# Altium PCB MiniPC.PcbDoc (part 9 of 24)
Units mm, origin at the board's own origin, x right, y up, seen from the top; angles counter-clockwise.
Board outline 175 x 155 mm, 16 copper layers (1_Top, 2_int1_(gnd), 3_int2_(power), 4_int3_(gnd), 5_int4_(sign), 6_int5_(power), 7_int6_(sign), 8_int7_(power), 9_int8_(gnd), 10_int9_(sign), 11_int10_(gnd), 12_int11_(sign), 13_int12_(gnd), 14_int13_(power), 15_int14_(gnd), 16_Bottom), stack 2.008 mm thick; 1046 components, 837 nets, 6010 pads, 4009 vias.
Unrouted connection lines stored in the file: 564.
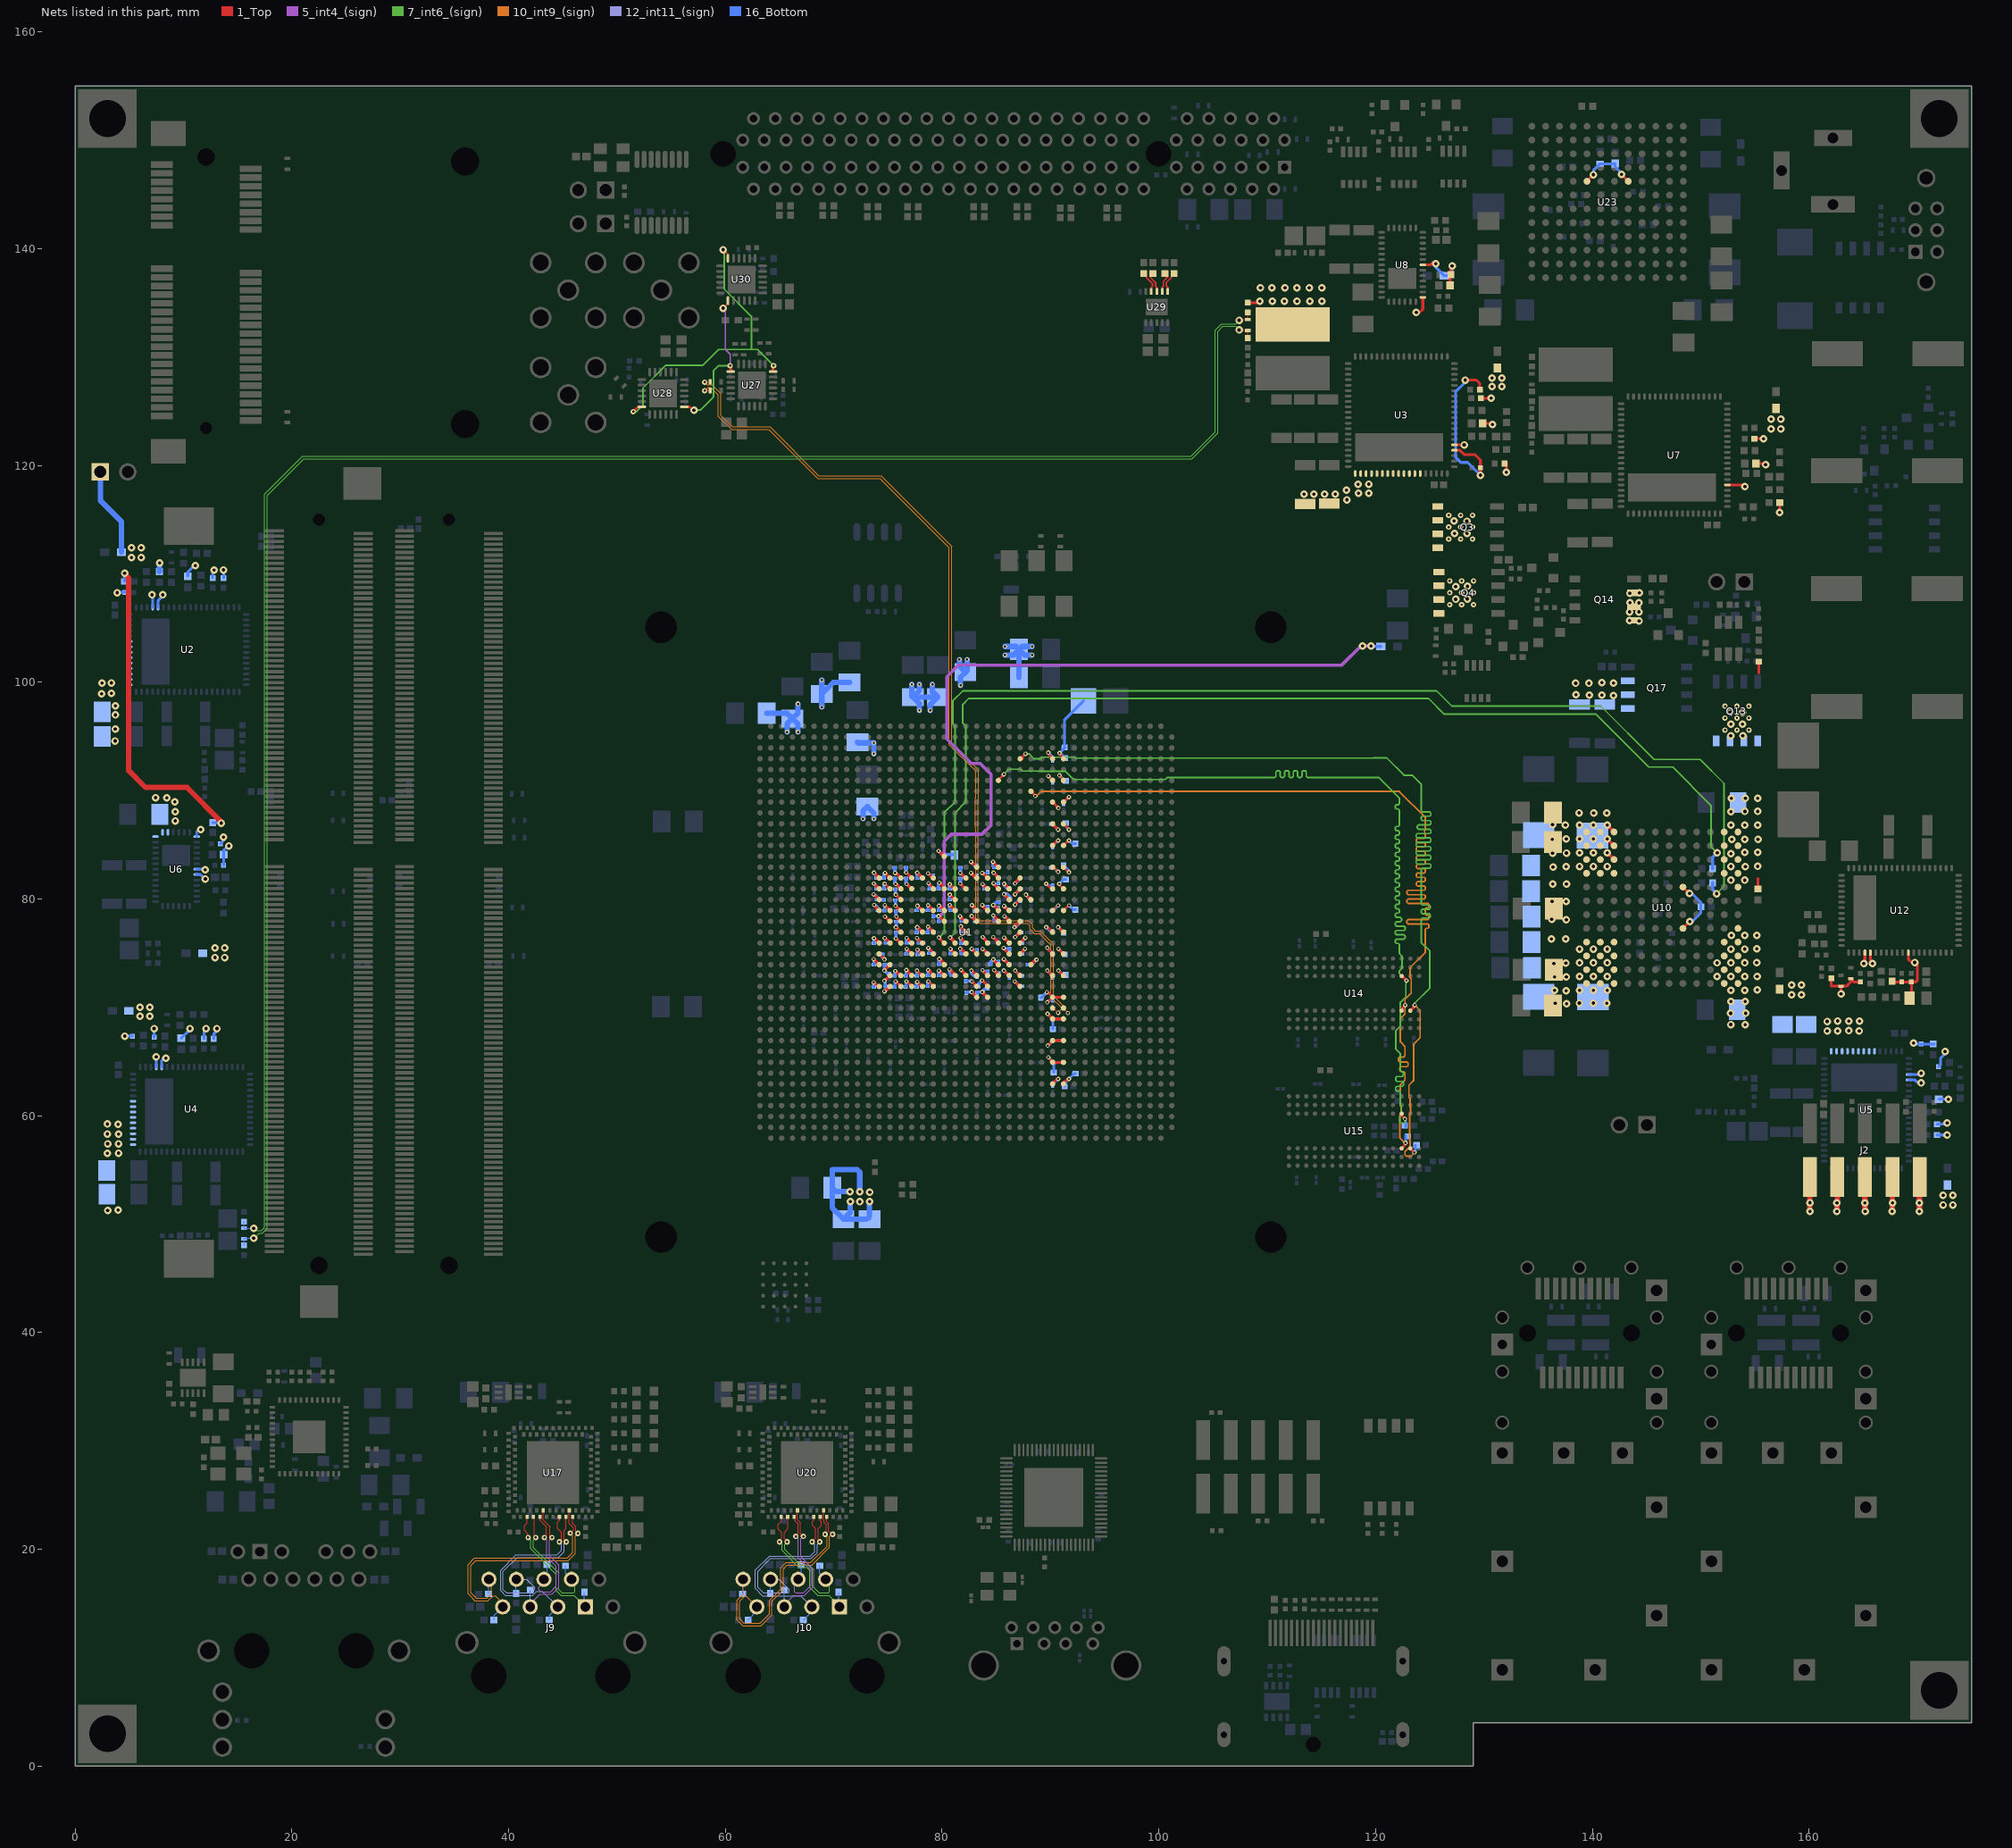
[diagram p21: the nets of this part, all layers, seen from the top]

## Via types
v1: diameter 0.4, hole 0.2, 1_Top to 16_Bottom, tented both sides, 1658 vias
v2: diameter 0.5, hole 0.2, 1_Top to 16_Bottom, tented both sides, 1014 vias
v3: diameter 0.7, hole 0.3, 1_Top to 16_Bottom, tented both sides, 915 vias
v4: diameter 0.6, hole 0.2, 1_Top to 16_Bottom, tented both sides, 278 vias
v5: diameter 0.4, hole 0.2, 1_Top to 16_Bottom, 93 vias
v6: diameter 0.4/0/0/0/0/0/0/0/0/0/0/0/0/0/0/0.4 (per signal layer), hole 0.2, 1_Top to 16_Bottom, tented both sides, 18 vias
v7: diameter 0.4/0/0/0/0/0/0/0/0/0/0/0.4/0.4/0.4/0.4/0.4 (per signal layer), hole 0.2, 1_Top to 16_Bottom, tented both sides, 16 vias
v8: diameter 0.5, hole 0.254, 1_Top to 16_Bottom, tented both sides, 15 vias
v9: diameter 0.5, hole 0.2, 1_Top to 16_Bottom, 2 vias

## Nets (pads, with @x,y where several pads share a name; then routed paths per layer and width w, separated by ;. In a path a pad name is that pad's centre, name@x,y a point inside that pad or via, vN(x,y) a via of type N, cw(c..) or ccw(c..) an arc to the next point about the centre after c; other vN are vias at no path point) (continued)
A10_0V9: C80.1 C81.1 C82.2 C83.2 C84.2 C87.1 C88.1 C89.2 C90.2 C91.2 C92.2 C93.2 C132.2 C133.2 C134.2 C135.2 C136.2 C137.2 C138.2 C139.2 C140.2 C141.2 C147.2 C148.2 C149.2 C150.2 C151.2 C152.2 C153.2 C154.2 C155.2 C156.2 C157.2 C158.2 C159.2 C160.2 C168.2 C169.2 C170.2 C171.2 C172.2 C173.2 C174.2 C175.2 C176.2 C177.2 C178.2 C179.2 C180.2 C181.2 C182.2 C183.2 C184.2 C185.2 C186.2 C187.2 C188.2 C189.2 C190.2 C191.2 C192.2 C193.2 C194.2 C195.2 C196.2 C197.2 C198.2 C199.2 C200.2 C201.2 C202.2 C203.2 C204.2 C205.2 C206.2 C207.2 C208.2 C209.2 C210.2 C211.2 C212.2 C213.2 C214.2 C215.2 C216.2 C217.2 C218.2 C219.2 C220.2 C221.2 C222.2 C223.2 C224.2 C225.2 C226.2 C227.2 C228.2 C229.2 C230.2 C231.2 C232.2 C233.2 C234.2 C235.2 C236.2 C237.2 C238.2 C239.2 C240.2 C241.2 C242.2 C243.2 C244.2 C245.2 C246.2 C247.2 C248.2 C249.2 C250.2 C251.2 C252.2 C253.2 C254.2 C255.2 C256.2 C257.2 C258.2 C259.2 C260.2 C261.2 C262.2 C263.2 U1.AA12 U1.AA13 U1.AA14 U1.AA15 U1.AA16 U1.AA20 U1.AA22 U1.AA23 U1.AA24 U1.AA25 U1.AB12 U1.AB15 U1.AB16 U1.AB17 U1.AB19 U1.AB20 U1.AB21 U1.AB22 U1.AB24 U1.AB25 U1.AC12 U1.AC13 U1.AC18 U1.AC23 U1.AC24 U1.AC26 U1.AD13 U1.AD14 U1.AD15 U1.AD16 U1.AD17 U1.AD18 U1.AD19 U1.AD20 U1.AD21 U1.AD22 U1.AD23 U1.AD24 U1.AD25 U1.AE12 U1.AE13 U1.AE14 U1.AE15 U1.AE16 U1.AE17 U1.AE21 U1.AE22 U1.AE25 U1.AF21 U1.AF22 U1.P21 U1.P23 U1.R12 U1.R13 U1.R14 U1.R15 U1.R16 U1.R17 U1.R20 U1.R21 U1.R22 U1.R23 U1.R25 U1.T12 U1.T13 U1.T14 U1.T15 U1.T17 U1.T18 U1.T19 U1.T20 U1.T22 U1.T23 U1.T24 U1.T25 U1.U12 U1.U14 U1.U19 U1.U24 U1.U25 U1.U26 U1.V12 U1.V13 U1.V14 U1.V16 U1.V17 U1.V18 U1.V19 U1.V21 U1.V22 U1.V23 U1.V24 U1.W13 U1.W14 U1.W20 U1.W21 U1.W23 U1.W24 U1.W25 U1.Y14 U1.Y16 U1.Y17 U1.Y20 U1.Y25 U10.A1 U10.A2 U10.A3 U10.B1 U10.B2 U10.B3 U10.C1 U10.C2 U10.C3 U10.D1 U10.D2 U10.D3 U10.J1 U10.J2 U10.J3 U10.K1 U10.K2 U10.K3 U10.L1 U10.L2 U10.L3 U10.M1 U10.M2 U10.M3 | length 191.1
  1_Top w0.25: U1.AB12@74.194,74.939 74.679,74.455 v1(74.679,74.429) ; v1(74.7,81.4) 74.733,81.4 U1.T13@75.194,80.939
  1_Top w0.3: v1(73.675,80.425) 73.708,80.425 U1.U12@74.194,79.939 ; v1(73.679,72.304) 73.721,72.304 74.086,71.939 U1.AE12@74.194,71.939 ; v1@73.68,74.454 U1.AC12@74.194,73.939 ; v1(73.7,81.425) 74.186,80.939 U1.T12@74.194,80.939 ; v1(73.704,76.379) 73.771,76.379 74.194,75.956 U1.AA12@74.194,75.939 ; v1(73.708,82.425) U1.R12@74.194,81.939 ; v1(73.725,79.45) 73.725,79.408 U1.V12@74.194,78.939 ; v1(74.679,71.478) 74.733,71.478 U1.AE13@75.194,71.939 ; v1(74.679,72.454) 74.708,72.454 U1.AD13@75.194,72.939 ; v1(74.7,76.4) 74.733,76.4 U1.AA13@75.194,75.939 ; v1(74.704,79.429) U1.V13@75.194,78.939 ; v1@74.721,73.404 v1(74.679,73.404) 74.679,73.424 U1.AC13@75.194,73.939 ; v1(74.725,78.375) 74.758,78.375 U1.W13@75.194,77.939 ; v1(74.729,82.404) U1.R13@75.194,81.939 ; v1(75.665,82.4) 75.733,82.4 U1.R14@76.194,81.939 ; v1(75.679,73.354) 75.721,73.354 76.136,72.939 U1.AD14@76.194,72.939 ; v1(75.7,79.375) 76.136,78.939 U1.V14@76.194,78.939 ; v1(75.704,72.404) 75.73,72.404 U1.AE14@76.194,71.939 ; v1(75.704,81.379) 75.754,81.379 U1.T14@76.194,80.939 ; v1(75.725,76.35) 75.75,76.35 76.161,75.939 U1.AA14@76.194,75.939 ; v1(75.725,77.4) 75.733,77.4 U1.Y14@76.194,76.939 ; v1(75.725,80.4) 75.733,80.4 U1.U14@76.194,79.939 ; v1(75.775,78.375) 75.775,78.358 U1.W14@76.194,77.939 ; v1(76.675,82.45) 76.683,82.45 U1.R15@77.194,81.939 ; v1(76.7,73.45) 76.7,73.433 U1.AD15@77.194,72.939 ; v1(76.704,72.404) 76.73,72.404 U1.AE15@77.194,71.939 ; v1(76.725,75.4) 77.186,74.939 U1.AB15@77.194,74.939 ; v1(76.725,76.4) 77.186,75.939 U1.AA15@77.194,75.939 ; v1(76.729,81.379) 76.746,81.379 77.186,80.939 U1.T15@77.194,80.939 ; v1(77.675,73.4) 78.136,72.939 U1.AD16@78.194,72.939 ; v1(77.675,76.4) 78.136,75.939 U1.AA16@78.194,75.939 ; v1(77.7,72.35) 78.111,71.939 U1.AE16@78.194,71.939 ; v1(77.7,77.4) 77.733,77.4 U1.Y16@78.194,76.939 ; v1(77.7,82.425) 78.186,81.939 U1.R16@78.194,81.939 ; v1(77.725,75.325) 78.111,74.939 U1.AB16@78.194,74.939 ; v1(77.725,79.375) 78.161,78.939 U1.V16@78.194,78.939 ; v1(78.7,77.45) 79.194,76.956 U1.Y17@79.194,76.939 ; v1(78.7,79.425) 78.708,79.425 U1.V17@79.194,78.939 ; v1(78.7,82.375) 79.136,81.939 U1.R17@79.194,81.939 ; v1(78.704,73.454) 78.721,73.454 79.194,72.981 U1.AD17@79.194,72.939 ; v1(78.725,75.475) 78.75,75.475 79.194,75.031 U1.AB17@79.194,74.939 ; v1(78.729,72.404) 78.746,72.404 79.194,71.956 U1.AE17@79.194,71.939 ; v1(78.75,81.45) 79.194,81.006 U1.T17@79.194,80.939 ; v1(79.704,73.379) 79.721,73.379 80.161,72.939 U1.AD18@80.194,72.939 ; v1(79.704,79.379) 79.746,79.379 80.186,78.939 U1.V18@80.194,78.939 ; v1(79.75,74.475) 80.194,74.031 U1.AC18@80.194,73.939 ; v1(79.75,81.5) 80.194,81.056 U1.T18@80.194,80.939 ; v1(80.679,73.504) 80.696,73.504 81.194,73.006 U1.AD19@81.194,72.939 ; v1(80.7,79.45) 80.7,79.433 U1.V19@81.194,78.939 ; v1(80.7,80.4) 81.161,79.939 U1.U19@81.194,79.939 ; v1(80.7,81.35) 81.111,80.939 U1.T19@81.194,80.939 ; v1(80.775,75.4) 80.775,75.358 U1.AB19@81.194,74.939 ; v1(81.65,78.4) 82.111,77.939 U1.W20@82.194,77.939 ; v1(81.675,75.425) 81.708,75.425 U1.AB20@82.194,74.939 ; v1(81.675,81.425) 82.161,80.939 U1.T20@82.194,80.939 ; v1(81.675,82.4) 82.136,81.939 U1.R20@82.194,81.939 ; v1(81.7,76.4) 82.161,75.939 U1.AA20@82.194,75.939 ; v1(81.725,77.475) 81.725,77.408 U1.Y20@82.194,76.939 ; v1(81.75,73.45) 82.194,73.006 U1.AD20@82.194,72.939 ; v1(82.675,82.4) 82.675,82.375 83.111,81.939 U1.R21@83.194,81.939 ; v1(82.675,83.425) 82.708,83.425 U1.P21@83.194,82.939 ; v1(82.7,73.4) 82.733,73.4 U1.AD21@83.194,72.939 ; v1(82.725,71.425) 82.725,71.408 U1.AF21@83.194,70.939 ; v1(82.725,72.4) 82.733,72.4 U1.AE21@83.194,71.939 ; v1(82.725,75.4) 82.733,75.4 U1.AB21@83.194,74.939 ; v1(82.725,78.425) 82.725,78.375 83.161,77.939 U1.W21@83.194,77.939 ; v1(82.75,79.425) 82.75,79.383 U1.V21@83.194,78.939 ; v1(83.679,72.479) 83.721,72.479 84.194,72.006 U1.AE22@84.194,71.939 ; v1(83.7,71.425) 83.708,71.425 U1.AF22@84.194,70.939 ; v1(83.7,82.4) 83.733,82.4 U1.R22@84.194,81.939 ; v1(83.704,79.429) 83.704,79.396 84.161,78.939 U1.V22@84.194,78.939 ; v1(83.725,73.425) 84.194,72.956 U1.AD22@84.194,72.939 ; v1(83.725,75.4) 84.186,74.939 U1.AB22@84.194,74.939 ; v1(83.725,81.375) 84.161,80.939 U1.T22@84.194,80.939 ; v1(83.75,76.475) 84.194,76.031 U1.AA22@84.194,75.939 ; v1(84.7,83.425) 84.7,83.375 85.136,82.939 U1.P23@85.194,82.939 ; v1(84.704,79.429) 84.771,79.429 85.194,79.006 U1.V23@85.194,78.939 ; v1(84.725,76.475) 85.194,76.006 U1.AA23@85.194,75.939 ; v1(84.725,78.475) 85.194,78.006 U1.W23@85.194,77.939 ; v1(84.729,74.429) 84.729,74.404 U1.AC23@85.194,73.939 ; v1(84.75,81.45) 84.75,81.383 U1.T23@85.194,80.939 ; v1(84.75,82.425) 85.194,81.981 U1.R23@85.194,81.939 ; v1(84.8,73.425) 85.194,73.031 U1.AD23@85.194,72.939 ; v1(85.675,75.475) 85.675,75.458 U1.AB24@86.194,74.939 ; v1(85.7,73.4) 86.161,72.939 U1.AD24@86.194,72.939 ; v1(85.7,74.45) 85.7,74.433 U1.AC24@86.194,73.939 ; v1(85.725,76.425) 86.194,75.956 U1.AA24@86.194,75.939 ; v1(85.725,79.35) 85.725,79.3 86.086,78.939 U1.V24@86.194,78.939 ; v1(85.725,80.45) 85.725,80.408 U1.U24@86.194,79.939 ; v1(85.725,81.4) 85.733,81.4 U1.T24@86.194,80.939 ; v1(85.754,78.404) 85.771,78.404 86.194,77.981 U1.W24@86.194,77.939 ; v1(86.675,77.4) 86.675,77.42 U1.W25@87.194,77.939 ; v1(86.7,72.4) 87.161,71.939 U1.AE25@87.194,71.939 ; v1(86.725,76.475) 86.73,76.475 U1.Y25@87.194,76.939 ; v1(86.725,79.475) 86.73,79.475 U1.U25@87.194,79.939 ; v1(86.725,80.425) 87.194,80.894 U1.T25@87.194,80.939 ; v1(86.725,81.425) 86.725,81.47 U1.R25@87.194,81.939 ; v1(86.733,73.4) U1.AD25@87.194,72.939 ; U1.AB25@87.194,74.939 87.65,75.395 v1(87.65,75.4) ; U1.AA25@87.194,75.939 87.194,75.944 v1(87.675,76.425) ; v1(87.733,80.4) U1.U26@88.194,79.939 ; U1.AC26@88.194,73.939 88.655,74.4 v1(88.7,74.4) ; v3(141.36,84.275) U10.C3@141.995,83.64 ; v3(141.36,85.545) U10.B3@141.995,84.91 ; v3(141.36,86.815) U10.A3@141.995,86.18 ; U10.D3@141.815,82.37 U10.D3@141.995,82.37
  16_Bottom w0.17: v1(82.675,82.4) 82.915,82.16 C184.2@83.2,82.16 ; v1(83.7,82.4) 84.14,82.4 C175.2@84.2,82.46 ; v1(84.75,81.45) 85.19,81.45 C202.2@85.2,81.46
  16_Bottom w0.3: C137.2@73,50.475 C137.2@73.3,50.475 C137.2@73.3,50.75 ; v1(73.675,80.425) 73.745,80.425 73.985,80.185 C244.2@73.985,79.95 74.01,79.925 C245.2@74.615,79.925 ; v1(73.679,72.304) 73.685,72.297 C198.2@73.685,71.875 ; v1(73.679,74.454) 73.71,74.422 C153.2@73.71,73.95 ; v1(73.7,81.425) 73.935,81.19 C231.2@73.935,80.95 ; v1(73.704,76.379) 73.71,76.372 C240.2@73.71,75.925 ; v1@73.708,82.492 v1(73.708,82.425) 73.708,82.356 73.96,82.104 C220.2@73.96,81.925 ; v1(73.725,79.45) 73.845,79.45 74.06,79.235 C234.2@74.06,78.975 ; C258.2@74.485,74.908 74.485,74.622 v1(74.679,74.429) ; C221.2@74.615,81.925 74.615,82.29 v1(74.729,82.404) ; C241.2@74.64,80.925 74.64,81.34 v1(74.7,81.4) ; C218.2@74.665,78.925 74.704,78.964 v1(74.704,79.429) ; v1(74.679,72.454) 74.75,72.382 74.75,71.96 C238.2@74.785,71.925 ; v1(74.7,76.4) 74.785,76.315 C219.2@74.785,75.95 ; C237.2@74.735,73.95 74.679,73.894 v1(74.679,73.404) 74.997,73.085 C197.2@75.15,73.085 ; C199.2@75.59,71.875 75.67,71.955 75.67,72.37 v1(75.704,72.404) ; C211.2@75.615,72.9 75.679,72.964 v1(75.679,73.354) ; C243.2@75.64,81.9 75.64,81.443 v1(75.704,81.379) ; C235.2@75.64,82.9 75.64,82.425 v1(75.665,82.4) ; C246.2@75.69,79.9 75.69,79.385 v1(75.7,79.375) ; C206.2@75.69,80.9 75.69,80.435 v1(75.725,80.4) ; v1(75.725,76.35) 75.74,76.365 C257.2@75.74,76.9 ; v1(75.725,77.4) 75.79,77.465 C248.2@75.79,77.925 ; C247.2@75.74,78.9 75.74,78.41 v1(75.775,78.375) ; C225.2@76.615,71.9 76.695,71.98 76.695,72.395 v1(76.704,72.404) ; C212.2@76.64,72.925 76.7,72.985 v1(76.7,73.45) ; C207.2@76.665,81.9 76.665,81.443 v1(76.729,81.379) ; C256.2@76.665,82.9 76.665,82.46 v1(76.675,82.45) ; C210.2@76.715,74.925 76.725,74.935 v1(76.725,75.4) ; v1(76.725,76.4) 76.725,75.965 C208.2@76.74,75.95 ; C250.2@77.64,71.9 77.64,72.29 v1(77.7,72.35) ; C236.2@77.64,76.925 77.64,77.34 v1(77.7,77.4) ; C226.2@77.665,72.925 77.665,73.39 v1(77.675,73.4) ; C205.2@77.665,78.95 77.725,79.01 v1(77.725,79.375) ; v1(77.675,76.4) 77.84,76.235 C196.2@77.84,75.95 ; v1(77.7,82.425) 77.7,81.94 C242.2@77.715,81.925 ; v1(77.725,75.325) 77.74,75.31 C239.2@77.74,74.9 ; C251.2@78.665,71.95 78.665,72.34 v1(78.729,72.404) ; C209.2@78.665,76.925 78.7,76.96 v1(78.7,77.45) ; C213.2@78.69,72.95 78.69,73.44 v1(78.704,73.454) ; C191.2@78.69,78.95 78.69,79.415 v1(78.7,79.425) ; v1(78.7,82.375) 78.91,82.165 C204.2@79.175,82.165 ; v1(78.725,75.475) 78.815,75.385 C222.2@78.815,75 ; v1(78.75,81.45) 78.86,81.34 C232.2@78.86,80.925 ; C233.2@79.665,80.95 79.665,81.415 v1(79.75,81.5) ; v1(79.704,73.379) 79.715,73.367 C252.2@79.715,72.95 ; v1(79.704,79.379) 79.715,79.368 C194.2@79.715,78.95 ; C159.2@79.715,73.975 79.715,74.44 v1(79.75,74.475) ; v1(80.679,73.504) 80.679,73.161 C255.2@80.865,72.975 ; v1(80.7,79.45) 80.7,79.04 C176.2@80.765,78.975 ; v1(80.7,80.4) 80.7,79.99 C171.2@80.715,79.975 ; v1(80.7,81.35) 80.7,80.94 C173.2@80.715,80.925 ; C214.2@80.765,74.95 80.775,74.96 v1(80.775,75.4) ; v1(81.65,78.4) 81.7,78.35 81.7,78.065 C203.2@81.79,77.975 ; v1(81.675,75.425) 81.725,75.375 81.725,75.04 C249.2@81.79,74.975 ; v1(81.675,81.425) 81.69,81.44 C188.2@81.69,81.9 ; v1(81.675,82.4) 81.69,82.415 C190.2@81.69,82.9 ; v1(81.7,76.4) 81.7,75.99 C160.2@81.765,75.925 ; v1(81.725,77.475) 81.725,77.015 C224.2@81.765,76.975 ; C253.2@82.2,72.435 82.69,72.435 v1(82.725,72.4) ; C200.2@82.225,71.36 82.29,71.425 v1(82.725,71.425) ; v1(82.675,83.425) 82.675,83.411 82.996,83.09 C193.2@83.175,83.09 ; v1(82.7,73.4) 82.7,73.161 83.021,72.84 C158.2@83.2,72.84 ; v1(82.725,75.4) 82.84,75.285 C227.2@83.2,75.285 ; v1(82.725,78.425) 83.065,78.085 C177.2@83.065,77.925 ; v1(82.75,79.425) 83.015,79.16 C179.2@83.015,78.9 ; C195.2@83.225,71.335 83.315,71.425 v1(83.7,71.425) 84.04,71.765 C157.2@84.2,71.765 ; C155.2@83.335,71.925 83.335,72.134 v1(83.679,72.479) ; v1@83.7,82.361 v1(83.7,82.4) ; v1(83.704,79.429) 83.848,79.285 C183.2@84.2,79.285 ; v1(83.725,73.425) 83.865,73.285 C260.2@84.2,73.285 ; v1(83.725,75.4) 84.115,75.01 C230.2@84.115,74.95 ; v1(83.725,81.375) 83.91,81.19 C187.2@83.91,80.925 ; v1(83.75,76.475) 84.19,76.035 C254.2@84.19,75.95 ; C154.2@84.46,73.975 84.46,74.159 v1(84.729,74.429) 84.943,74.215 C262.2@85.2,74.215 ; v1(84.7,83.425) 84.7,83.04 C170.2@84.815,82.925 ; v1(84.725,78.475) 84.8,78.4 84.8,78.035 C185.2@84.86,77.975 ; v1(84.75,82.425) 85.1,82.075 C172.2@85.14,82.075 ; v1(84.8,73.425) 84.805,73.425 85.12,73.11 C156.2@85.225,73.11 ; C181.2@85.2,79.185 85.033,79.185 84.789,79.429 v1(84.704,79.429) 84.965,79.69 C174.2@85.225,79.69 ; v1(85.675,75.475) 85.765,75.385 C216.2@86.225,75.385 ; v1(85.7,73.4) 86.2,72.9 C259.2@86.2,72.735 ; v1(85.7,74.45) 86.175,73.975 C263.2@86.19,73.975 ; v1(85.725,79.35) 86.075,79 C178.2@86.14,79 ; v1(85.725,80.45) 85.975,80.45 86.26,80.165 C201.2@86.26,79.975 ; v1(85.725,81.4) 85.725,81.286 86.021,80.99 C192.2@86.2,80.99 ; v1(85.754,78.404) 85.771,78.404 86.175,78 C182.2@86.175,77.91 ; v1(86.675,77.4) 86.74,77.4 C168.2@87.29,77.95 ; v1(86.7,72.4) 87.15,71.95 C223.2@87.39,71.95 ; v1(86.725,76.475) 87.175,76.925 C217.2@87.29,76.925 ; v1(86.725,79.475) 86.725,79.539 87.021,79.835 C180.2@87.2,79.835 ; v1(86.725,80.425) 87.25,80.95 C169.2@87.265,80.95 ; v1(86.725,81.425) 87.215,81.915 C189.2@87.215,81.95 ; v1(86.733,73.4) 87.233,72.9 C261.2@87.39,72.9 ; C228.2@87.365,74.925 87.365,75.115 v1(87.65,75.4) ; C215.2@87.39,75.925 87.39,76.14 v1(87.675,76.425) ; v1(87.733,80.4) 87.733,80.352 C186.2@88.2,79.885 ; C229.2@87.91,73.95 88.25,73.95 v1(88.7,74.4)
  16_Bottom w0.5: C138.2@63.825,97.13 65.695,97.13 C140.2@66.175,96.65 ; v1(65.7,95.4) 65.7,96.175 C140.2@66.175,96.65 ; v1(66.7,95.4) 66.7,96.125 C140.2@66.175,96.65 ; v1(66.7,98) 66.7,97.175 C140.2@66.175,96.65 ; v1(68.9,97.7) C148.2@68.9,98.925 ; v1(68.9,100.2) C148.2@68.9,98.925 ; C152.2@71.46,99.975 69.95,99.975 C148.2@68.9,98.925 ; v3(71.5,53) 70.225,53 C151.2@69.85,53.375 ; v3(71.525,52.1) 71.525,51.1 C136.2@70.9,50.475 ; C147.2@72.194,94.464 72.258,94.4 v1(73.7,94.4) v1(73.7,93.4) ; v3(72.4,53) 72.4,54.8 72.175,55.025 69.85,55.025 C151.2@69.85,53.375 ; v1(72.7,87.4) 72.7,88.125 C141.2@73.1,88.525 73.7,87.925 v1(73.7,87.4) ; C137.2@73,50.475 C136.2@70.9,50.475 ; C137.2@73.3,50.75 v3(73.3,52.1) ; v1(77.2,99.8) 77.2,98.725 C150.2@77.3,98.625 ; v1(77.9,97.4) 77.9,98.025 C150.2@77.3,98.625 ; v1(77.9,99.8) 77.9,99.225 C150.2@77.3,98.625 ; v1(78.9,97.4) 78.9,97.925 C149.2@79.6,98.625 ; v1(79.1,99.8) 79.1,99.125 C149.2@79.6,98.625 ; v1(81.6,102.1) 81.6,101.475 C133.2@82.15,100.925 ; v1(81.7,99.7) 81.7,100.475 C133.2@82.15,100.925 ; v1(82.3,102.1) 82.3,101.075 C133.2@82.15,100.925 ; v1(85.8,102.5) 86.575,102.5 C134.2@87.1,103.025 ; v1(85.8,103.3) 86.825,103.3 C134.2@87.1,103.025 ; C139.2@87.095,100.44 87.1,100.445 C134.2@87.1,103.025 ; v1(88.3,102.5) 87.625,102.5 C134.2@87.1,103.025 ; v1(88.3,103.3) 87.375,103.3 C134.2@87.1,103.025 ; C151.2@69.85,53.375 69.85,51.525 C136.2@70.9,50.475 ; C150.2@77.3,98.625 C149.2@79.6,98.625
  other v3: 72.4,52.075 73.325,52.95 137.63,70.35 141.33,70.37 136.56,70.39 138.79,70.4 140.1,70.4 136.49,71.57 137.58,71.55 138.82,71.575 140.09,71.575 141.36,71.575 137.59,72.8 136.51,72.82 138.82,72.845 140.09,72.845 141.36,72.845 136.44,74.05 137.55,74.1 138.82,74.115 140.09,74.115 141.36,74.115 138.82,75.385 140.09,75.385 141.36,75.385 136.22,76.31 137.52,76.3 137.59,78.08 136.24,78.12 136.28,79.77 137.56,79.78 137.6,81.37 136.33,81.39 136.36,82.96 137.58,82.99 138.82,83.005 140.09,83.005 141.36,83.005 136.32,84.23 137.6,84.24 138.82,84.275 140.09,84.275 136.31,85.5 137.59,85.54 138.82,85.545 140.09,85.545 137.51,86.81 138.82,86.815 140.09,86.815 136.32,86.85 140.11,87.92 141.33,87.93 138.78,87.95
A10_0V95_EN: R31.2 R87.1 | length 30.6
  1_Top w0.5: v3(4.572,110.058) 4.572,109.988 4.928,109.632 4.928,91.872 6.5,90.3 10.32,90.3 13.5,87.12 v3(13.5,87)
  16_Bottom w0.25: R31.2@4.55,109.3 4.55,110.036 v3(4.572,110.058) ; R87.1@12.7,87.05 13.45,87.05 v3(13.5,87)
A10_1V0: C390.1 C391.2 C392.2 C393.2 C394.2 C395.2 C396.2 C397.2 C398.2 C399.2 C400.2 C401.2 C402.2 C403.2 C404.2 C405.2 C406.2 C407.2 C408.2 C409.2 C410.2 C411.2 C412.2 C413.2 C414.2 C415.2 C416.2 C417.2 C418.2 C419.2 C420.2 C421.2 C422.2 R42.1 R44.2 U1.AB28 U1.AB29 U1.AD28 U1.AD29 U1.AF28 U1.AF29 U1.AH28 U1.AH29 U1.AK28 U1.AK29 U1.AM28 U1.AM29 U1.AP28 U1.AP29 U1.D28 U1.D29 U1.F28 U1.F29 U1.H28 U1.H29 U1.K28 U1.K29 U1.M28 U1.M29 U1.P28 U1.P29 U1.T28 U1.T29 U1.V28 U1.V29 U1.Y28 U1.Y29 | length 55.6
  1_Top w0.2: v1(89.6,81.4) 90.061,80.939 U1.T28@90.194,80.939 ; U1.V28@90.194,78.939 90.655,79.4 v1(90.7,79.4) ; U1.P28@90.194,82.939 90.261,82.939 v1(90.7,82.5) ; v1(90.8,81.4) 90.8,81.333 U1.T29@91.194,80.939 ; U1.V29@91.194,78.939 91.655,79.4 v1(91.727,79.4) ; U1.P29@91.194,82.939 91.7,82.433 v1(91.7,82.467)
  1_Top w0.254: v1(89.6,77.4) 89.733,77.4 U1.Y28@90.194,76.939 ; v1(89.667,71.4) 89.733,71.4 U1.AF28@90.194,70.939 ; v1(89.7,70.475) 89.7,70.445 U1.AF28@90.194,70.939 ; v1(89.7,73.4) 90.161,72.939 U1.AD28@90.194,72.939 ; v1(89.7,75.5) 89.7,75.433 U1.AB28@90.194,74.939 ; v1(89.725,69.4) 89.733,69.4 U1.AH28@90.194,68.939 U1.AH29@91.194,68.939 ; v1(89.74,66.485) U1.AK28@90.194,66.939 U1.AK29@91.194,66.939 ; v1(89.8,65.4) 89.8,65.333 U1.AM28@90.194,64.939 U1.AM29@91.194,64.939 ; v1(89.8,91.333) U1.F28@90.194,90.939 ; v1(89.8,93.5) 89.8,93.333 U1.D28@90.194,92.939 ; U1.AP28@90.194,62.939 90.161,62.939 90.621,63.4 v1(90.7,63.4) ; U1.M28@90.194,84.939 90.655,85.4 v1(90.7,85.4) ; U1.K28@90.194,86.939 90.194,86.906 v1(90.7,86.4) ; U1.H28@90.194,88.939 90.725,88.408 v1(90.725,88.4) ; v1(90.7,77.4) 90.733,77.4 U1.Y29@91.194,76.939 ; v1(90.734,73.4) U1.AD29@91.194,72.939 ; v1(90.734,75.4) U1.AB29@91.194,74.939 ; v1(90.83,91.4) 90.83,91.37 91.194,91.006 U1.F29@91.194,90.939 ; v1(90.837,93.463) 90.837,93.377 90.83,93.37 91.194,93.006 U1.D29@91.194,92.939 ; U1.AP29@91.194,62.939 91.194,63.006 91.588,63.4 v1(91.7,63.4) ; U1.AF29@91.194,70.939 U1.AF28@90.194,70.939 ; U1.M29@91.194,84.939 91.655,85.4 v1(91.7,85.4) ; U1.K29@91.194,86.939 91.7,86.433 v1(91.7,86.4) ; U1.H29@91.194,88.939 91.655,89.4 v1(91.7,89.4) ; R44.2@108.21,135.01 109.18,135.01 v3(109.32,135.15)
  16_Bottom w0.254: C421.2@89.1,70.89 89.157,70.89 v1(89.667,71.4) ; v1(89.6,77.4) 89.96,77.04 C393.2@90.2,77.04 ; v1(89.6,81.4) 89.76,81.24 C396.2@90.2,81.24 ; v1(89.7,70.475) 89.885,70.66 C397.2@90.2,70.66 ; v1(89.7,73.4) 90.2,72.9 C401.2@90.2,72.76 ; v1(89.7,75.5) 90.2,75 C405.2@90.2,74.86 ; v1(89.725,69.4) 90.225,68.9 C406.2@90.24,68.9 90.21,68.87 C410.2@90.21,68 ; v1(89.74,66.485) 89.785,66.485 C402.2@90.24,66.939 ; v1(89.8,65.4) 90.31,64.89 C418.2@90.31,64 ; v1(89.8,91.333) 90.2,90.933 C399.2@90.2,90.76 ; v1(89.8,93.5) 90.2,93.1 C403.2@90.2,92.76 ; C392.2@90.06,78.9 90.2,78.9 v1(90.7,79.4) ; C400.2@90.06,82.9 90.3,82.9 v1(90.7,82.5) ; C391.2@90.06,86.925 90.175,86.925 v1(90.7,86.4) ; C394.2@90.2,62.76 90.2,62.9 v1(90.7,63.4) ; C404.2@90.2,84.76 90.2,84.9 v1(90.7,85.4) ; v1(90.7,77.4) 91.2,76.9 C409.2@91.2,76.89 ; v1(90.734,73.4) 91.123,73.01 C417.2@91.4,73.01 ; v1(90.734,75.4) 91.233,74.9 C413.2@91.31,74.9 ; v1(90.8,81.4) 91.2,81.8 C416.2@91.41,81.8 ; v1(90.83,91.4) 91.33,90.9 C415.2@91.41,90.9 ; C412.2@91.2,83.11 91.7,82.61 v1(91.7,82.467) ; C395.2@91.2,88.76 91.2,88.9 v1(91.7,89.4) ; C422.2@91.31,62.699 91.31,63.01 v1(91.7,63.4) 92.2,63.9 C414.2@92.31,63.9 ; C419.2@91.36,93 90.897,93.463 v1(90.837,93.463) 91.31,93.936 C407.2@91.31,94 91.273,94.037 91.273,96.508 C390.1@93.045,98.28 ; C411.2@91.41,87 91.41,86.69 v1(91.7,86.4) ; v1(91.7,85.4) 91.99,85.11 C408.2@92.3,85.11 ; v1(91.727,79.4) 92.117,79.01 C420.2@92.3,79.01
  other v3: 115.03,135.14 110.46,135.15 111.59,135.15 112.75,135.15 113.92,135.15 109.37,136.38 110.43,136.38 111.64,136.37 112.74,136.37 113.87,136.37 115.02,136.38
A10_12V: C85.2 C86.2 Q13.5 Q13.6 Q13.7 Q13.8 R113.2 R141.2 U10.A11 U10.A12 U10.B11 U10.B12 U10.C11 U10.C12 U10.D11 U10.D12 U10.E12 U10.H12 U10.J11 U10.J12 U10.K11 U10.K12 U10.L11 U10.L12 U10.M11 U10.M12 | length 2.3
  1_Top w0.25: R141.2@155.26,80.93 155.26,81.91 ; 155.345,100.85 R113.2@155.345,101.9
  1_Top w0.3: U10.C11@152.155,83.64 U10.C11@152.21,83.64 ; U10.B11@152.155,84.91 U10.B11@152.28,84.91 ; U10.B12@153.425,84.91 U10.B12@153.48,84.91 ; v3@154.065,84.28 v3(154.065,84.295)
  other v2: 152.23,95.59 153.33,95.59 154.43,95.59 152.23,96.69 153.33,96.69 154.43,96.69 152.23,97.79 153.33,97.79 154.43,97.79
  other v3: 152.76,68.42 154.09,68.41 152.75,69.46 154.13,69.46 152.77,70.54 154.08,70.55 152.79,71.575 154.06,71.575 155.2,71.61 151.5,72.84 152.79,72.845 154.06,72.845 155.19,72.86 151.49,74.11 152.79,74.115 154.06,74.115 155.15,74.12 152.79,75.385 154.06,75.385 155.16,75.41 152.82,76.63 155.16,76.64 154.06,76.655 152.79,81.735 154.06,81.735 154.11,83 152.79,83.005 155.26,83.01 152.765,84.195 155.25,84.3 152.865,85.495 154.065,85.495 155.27,85.51 152.79,86.815 154.06,86.815 155.24,86.83 152.79,88.05 154.07,88.08 155.24,88.08 152.83,89.3 154.11,89.3 155.24,89.28 152.76,95.06 153.87,95.06 153.85,96.13 152.78,96.14 153.84,97.22 152.71,97.23
A10_GNDSENSE: R143.2 U1.AA18 | length 109.9
  1_Top w0.3: v1(79.7,76.45) 79.7,76.433 U1.AA18@80.194,75.939
  7_int6_(sign) w0.15: v1(79.7,76.45) 79.725,76.45 80.2,76.925 80.2,87.975 81.2,88.975 81.2,95.95 81,96.15 81,98.3 81.9,99.2 125.625,99.2 127.025,97.8 140.77,97.8 145.7,92.87 149.94,92.87 152.14,90.67 152.14,81.17 v3(151.465,80.495)
  16_Bottom w0.3: R143.2@151.09,81.495 151.09,80.87 v3(151.465,80.495)
A10_HLVDDI_N: C23.1 C26.1 R45.1 R53.1 | length 173.8
  1_Top w0.1: v3@107.61,132.54 107.7,132.45 C23.1@108.21,132.45 R45.1@108.21,131.75
  7_int6_(sign) w0.09: v3@16.6,48.62 16.6,48.75 17.01,49.16 17.279,49.16 17.74,49.621 17.74,117.24 21.1,120.6 103.059,120.6 105.43,122.971 105.43,132.36 105.89,132.82 107.07,132.82 v3(107.4,132.49)
  16_Bottom w0.1: R53.1@15.59,48.06 15.6,48.07 C26.1@15.6,48.65 15.67,48.72 v3(16.48,48.72)
A10_HLVDDI_P: C23.2 C26.2 R44.1 R51.1 | length 174.1
  1_Top w0.1: v3(107.4,133.39) 107.4,133.22 107.63,133.45 C23.2@108.21,133.45 R44.1@108.21,134.11
  7_int6_(sign) w0.09: v3(16.48,49.63) 16.71,49.4 17.18,49.4 17.5,49.72 17.5,117.339 21.001,120.84 102.96,120.84 105.19,123.07 105.19,132.459 105.791,133.06 107.07,133.06 v3(107.4,133.39)
  16_Bottom w0.1: R51.1@15.6,50.23 C26.2@15.6,49.65 15.62,49.63 v3(16.48,49.63)
A10_MAIN_1V8: C71.2 C72.2 Q3.5 Q3.6 Q3.7 Q3.8 Q4.5 Q4.6 Q4.7 Q4.8 Q17.1 Q17.2 Q17.3
  other v2: 126.833,107.15 127.933,107.15 129.033,107.15 126.833,108.25 127.933,108.25 129.033,108.25 126.833,109.35 127.933,109.35 129.033,109.35 126.74,113.205 127.84,113.205 128.94,113.205 126.74,114.305 127.84,114.305 128.94,114.305 126.74,115.405 127.84,115.405 128.94,115.405
  other v3: 141.93,98.77 140.86,98.8 139.73,98.81 138.48,98.85 138.46,99.9 139.69,99.9 141.95,99.93 140.88,99.95 127.38,107.65 128.45,107.68 127.38,108.82 128.47,108.84 127.28,113.72 128.42,113.72 128.41,114.85 127.23,114.86
A10_MAIN_3V3: C9.2 C10.2 C18.2 C19.2 C28.2 C29.2 C37.2 C38.2 C45.2 Q14.1 Q14.2 Q14.3 R33.1 R34.2 R46.1 R47.2 R60.1 R61.2 R74.2 R75.1 R77.2 R89.1 U2.35 U2.36 U2.37 U2.38 U2.39 U2.40 U2.41 U2.42 U2.43 U2.52 U3.39 U3.40 U3.41 U3.42 U3.43 U3.44 U3.45 U3.46 U3.47 U3.48 U3.49 U3.50 U3.51 U3.60 U4.35 U4.36 U4.37 U4.38 U4.39 U4.40 U4.41 U4.42 U4.43 U4.52 U5.35 U5.36 U5.37 U5.38 U5.39 U5.40 U5.41 U5.42 U5.43 U5.52 U6.19 U6.20 U6.21 U6.33 | length 28.4
  1_Top w0.25: U3.60@127.265,121.395 127.781,121.395 128.181,120.995 129.165,120.995 129.665,120.495 R47.2@129.665,119.795 v3(129.665,119.095) ; v3(128.265,127.87) 129.29,127.87 129.615,127.545 R46.1@129.615,126.995
  16_Bottom w0.25: v3(3.9,108.26) 3.94,108.3 R34.2@4.6,108.3 ; v3(4.595,67.35) 4.495,67.35 R61.2@5.295,67.35 ; v3(7.1,108.06) 7.1,107.86 7.15,107.81 U2.52@7.15,106.91 ; v3(7.495,65.45) 7.495,65.539 7.5,65.545 U4.52@7.5,64.5 ; U6.33@11.225,82.25 11.566,82.25 11.741,82.075 11.749,82.075 v3@12.025,81.799 ; v3@12.025,81.739 12,81.764 v3@12.025,81.789 ; v3(12.025,81.85) v3@12.025,81.799 ; R60.1@12.795,67.1 12.795,67.55 13.07,67.825 13.095,67.8 v3(13.095,68.05) ; R89.1@13.4,85.1 13.7,85.4 v3(13.7,85.7) ; R33.1@13.7,109.61 v3(13.7,110.36) ; v3(128.265,127.87) 128.265,127.67 127.365,126.77 127.365,120.765 127.86,120.27 128.49,120.27 v3(129.665,119.095) ; U5.52@169.185,63.806 170.21,63.806 v3(170.335,63.93) ; v3(169.635,66.73) 169.735,66.63 R77.2@170.335,66.63 R74.2@171.435,66.63 R74.2@171.535,66.63 ; R75.1@171.785,58.23 v3(172.735,58.23) ; v3@12.025,81.789 v3@12.025,81.799 ; v3@12.025,81.789 12.03,81.794 v3@12.025,81.799
  other v3: 3.01,51.27 3.96,51.3 2.98,56.54 4.02,56.56 3.01,57.42 4.02,57.42 4.01,58.31 2.99,58.33 2.99,59.24 3.98,59.23 161.66,67.82 162.63,67.83 163.64,67.85 164.62,67.84 161.66,68.71 162.62,68.75 163.64,68.74 164.64,68.74 9.25,87.21 9.26,88.07 9.22,88.95 7.44,89.35 8.45,89.33 3.7,94.58 3.71,95.68 3.72,96.98 3.73,97.82 2.46,98.94 3.35,98.97 2.48,99.93 3.35,99.94 143.43,105.68 144.31,105.66 143.42,106.49 144.29,106.49 143.46,107.33 144.28,107.32 143.45,108.21 144.33,108.24 117.34,116.83 113.39,117.34 115.3,117.34 114.29,117.36 116.29,117.35 118.41,117.43 119.37,117.44 117.31,117.73 118.38,118.26 119.38,118.27
A10_VCCAPLL: C458.2 C459.2 L15.2 U1.W18 | length 70.9
  1_Top w0.3: v1(79.675,78.425) 79.708,78.425 U1.W18@80.194,77.939
  5_int4_(sign) w0.3: v1(79.675,78.425) 79.8,78.425 80.2,78.825 80.2,85.325 80.85,85.975 83.675,85.975 84.525,86.825 84.525,91.475 83.5,92.5 82.7,92.5 80.425,94.775 80.425,100.5 81.505,101.58 116.88,101.58 118.625,103.325 v3(118.775,103.325) v3(119.575,103.325)
  16_Bottom w0.3: C459.2@79.175,78.41 79.66,78.41 v1(79.675,78.425) 79.69,78.41 C458.2@79.69,77.925 ; v3(119.575,103.325) 119.6,103.3 L15.2@120.475,103.3
A10_VCCLSENSE: R142.2 U1.AA19 | length 102.5
  1_Top w0.3: v1(80.738,76.45) 80.75,76.45 81.194,76.006 U1.AA19@81.194,75.939
  7_int6_(sign) w0.15: v1(80.738,76.45) 81.2,76.912 81.2,87.975 82.175,88.95 82.175,95.95 81.9,96.225 81.9,97.95 82.45,98.5 124.875,98.5 126.323,97.052 140.328,97.052 145.21,92.17 147.41,92.17 150.94,88.64 150.94,84.845 v3(151.515,84.27)
  16_Bottom w0.3: R142.2@151.09,82.795 151.09,83.845 v3(151.515,84.27)
A10VCCAPLLHPS: C463.2 L16.2 U1.N18 | length 2.4
  1_Top w0.3: v1(79.675,84.425) 80.161,83.939 U1.N18@80.194,83.939
  16_Bottom w0.3: v1(79.675,84.425) 80.01,84.09 C463.2@80.225,84.09 81.11,84.09 L16.2@81.15,84.05
AGND1: C109.1 C110.1 C114.2 L10.2 R177.1 R180.1 R181.1 R182.1 R183.1 U12.52 U12.53 U12.60 | length 14.5
  1_Top w0.25: R180.1@162.034,72.7 162.034,71.95 C109.1@162.934,71.95 ; v3(162.934,71.25) C109.1@162.934,71.95 ; C114.2@163.834,72.55 163.834,72.35 163.434,71.95 C109.1@162.934,71.95 ; C114.2@163.835,72.65 164.134,72.35 R177.1@164.734,72.35 ; v3(165.034,74.05) v3@164.884,74.05 ; U12.52@165.134,75.05 165.134,74.35 164.934,74.15 164.884,74.099 v3@164.884,74.05 ; U12.53@165.634,75.05 165.634,74.15 165.735,74.05 v3(165.834,74.05) ; C110.1@167.534,72.45 167.634,72.35 R182.1@168.534,72.35 R181.1@169.434,72.35 ; U12.60@169.134,75.05 169.134,74.45 169.434,74.15 v3(169.734,74.15) 169.834,74.15 169.959,74.025 169.959,72.475 169.834,72.35 R181.1@169.434,72.35 ; R183.1@169.434,70.75 R181.1@169.434,72.35 ; v3@164.884,74.05 164.884,74.001 164.834,74.05 v3@164.884,74.05
  other v3: 158.38,71.16 159.28,71.16 158.38,72.06 159.28,72.06
AGND2: C65.1 L7.2 R110.1 U8.26 U8.32 | length 7.8
  1_Top w0.25: v3(123.75,134.1) 124.05,134.1 124.35,134.4 U8.26@124.35,135.5 ; U8.32@124.35,138.5 125.05,138.5 125.25,138.7 v3@125.45,138.7
  1_Top w0.3: C65.1@126.86,136.6 126.86,137.51 R110.1@126.95,137.6 126.95,138.3 v3(127.05,138.4)
  16_Bottom w0.25: v3(125.55,138.6) 125.55,138.275 L7.2@126.325,137.5 126.85,137.5 127.05,137.7 v3(127.05,138.4)
AGND3: C58.1 L6.2 R90.2 R103.2 U7.61 | length 4.8
  1_Top w0.25: U7.61@152.445,118.2 154.11,118.2 153.97,118.06 v3(154.07,118.06) ; R103.2@154.945,122.46 155.87,122.46 v3(155.77,122.46) ; C58.1@155.08,120.16 155.87,120.16 v3(155.97,120.06) ; v3(157.27,115.66) 157.295,115.685 R90.2@157.295,116.56
  other v3: 156.47,123.36 157.37,123.36 156.47,124.26 157.37,124.26
AGND4: C49.1 L5.2 R88.1 U6.26 U6.32 | length 4.2
  16_Bottom w0.17: U6.26@11.225,85.75 11.225,86.225 11.4,86.4 v3(11.6,86.4)
  16_Bottom w0.25: U6.32@11.225,82.75 12.05,82.75 12.2,82.6 12.175,82.575 12.05,82.7 v3(12,82.7) ; R88.1@13.7,83.1 C49.1@13.7,84 ; C49.1@13.71,84.1 13.71,84.51 14.1,84.9 v3(14.2,84.9)
  other v3: 12.9,74.6 13.8,74.6 12.9,75.5 13.8,75.5
AGND5: C14.1 J1.1 L1.2 R21.1 R35.2 U2.53 | length 12.7
  16_Bottom w0.25: U2.53@7.65,106.91 7.65,107.51 8.1,107.96 v3(8.1,108.06) ; C14.1@10.4,109.77 10.4,110.16 11,110.76 v3(11.1,110.76) ; R35.2@12.7,109.61 12.7,110.36 12.825,110.235 v3(12.825,110.35)
  16_Bottom w0.5: J1.1@2.33,119.4 2.33,116.77 4.275,114.825 L1.2@4.275,112 ; R21.1@7.8,110.2 v3(7.8,111)
  other v3: 5.2,111.5 6.1,111.5 5.2,112.4 6.1,112.4
AGND6: C24.1 L2.2 R36.2 R48.2 U3.61 | length 3.7
  1_Top w0.25: U3.61@127.265,121.895 v3(128.165,121.895) ; R48.2@129.715,126.195 v3(130.665,126.195) ; C24.1@129.875,123.87 130.665,123.87 v3(130.765,123.77) ; v3(132.065,119.37) 132.09,119.395 R36.2@132.09,120.27
  other v3: 130.74,127.26 131.64,127.26 130.74,128.06 131.64,128.06
AGND7: C33.1 L3.2 R49.1 R62.2 U4.53 | length 4.2
  16_Bottom w0.25: R49.1@7.295,67.25 v3(7.295,68.05) ; U4.53@8,64.5 7.995,64.505 7.995,65.066 8.12,65.191 8.12,65.275 8.195,65.35 8.22,65.325 v3(8.37,65.325) ; C33.1@9.795,67.16 10.595,67.96 v3(10.595,68.05) ; R62.2@11.895,67.1 11.895,67.75 12.095,67.95 v3(12.095,68.05)
  other v3: 6,69.2 6.9,69.2 6,70 6.9,70
AGND8: C42.1 J2.1 J2.3 J2.5 J2.7 J2.9 L4.2 R63.1 R79.2 U5.53 | length 21.3
  1_Top w0.5: J2.1@160.055,54.355 160.055,51.885 v3@160.06,51.89 ; v3(160.06,51.18) v3@160.06,51.89 ; v3(160.06,51.985) v3@160.06,51.89 ; v3(162.56,51.18) v3@162.56,51.85 ; v3(162.56,51.98) v3@162.56,51.85 ; J2.3@162.595,54.355 162.595,51.815 v3@162.56,51.85 ; J2.5@165.135,54.355 v3(165.135,51.98) 165.135,51.205 v3(165.16,51.18) ; v3(167.66,51.18) 167.675,51.195 v3(167.675,51.98) J2.7@167.675,54.355 ; v3(170.16,51.18) v3(170.16,51.98) 170.16,54.3 J2.9@170.215,54.355
  16_Bottom w0.25: U5.53@169.185,63.306 169.759,63.306 170.035,63.03 v3(170.335,63.03) ; R79.2@171.785,59.23 172.635,59.23 v3(172.735,59.33) ; R63.1@171.935,64.53 172.135,64.73 172.135,65.33 172.735,65.93 v3(172.535,65.93) ; C42.1@171.945,61.53 v3(172.835,61.53)
  other v3: 172.36,51.78 173.26,51.78 172.36,52.68 173.26,52.68
AMDI0_N: J9.2 R250.1 U17.A17 | length 12.2
  1_Top w0.1: U17.A17@42.3,23 42.35,22.95 42.35,21.25 v2(42.5,21.1)
  7_int6_(sign) w0.09: v2(42.5,21.1) 42.27,20.87 42.27,20.169 44.64,17.799 44.64,16.3 44.94,16 46,16 46.1,16.1 46.1,16.95 J9.2@45.805,17.245
  16_Bottom w0.1: R250.1@45.25,18.5 45.25,17.8 J9.2@45.805,17.245
AMDI0_P: J9.1 R249.1 U17.A16 | length 12.8
  1_Top w0.1: U17.A16@41.7,23 41.7,22.436 41.45,22.186 41.45,21.75 41.8,21.4 v2(41.8,21.1)
  7_int6_(sign) w0.09: v2(41.8,21.1) 42.03,20.87 42.03,20.07 44.4,17.7 44.4,16.201 44.841,15.76 46.02,15.76 J9.1@47.075,14.705
  16_Bottom w0.1: R249.1@47,16.05 47,14.78 J9.1@47.075,14.705
AMDI1_N: J9.4 R252.1 U17.B16 | length 13
  1_Top w0.1: U17.B16@43.2,23.6 43.2,22.711 43.55,22.361 43.55,22.356 43.8,22.106 43.8,21.2 43.9,21.2 v2(44,21.1)
  5_int4_(sign) w0.09: J9.4@41.995,14.705 41.995,14.955 42.9,15.86 43.999,15.86 44.64,16.501 44.64,18.54 43.77,19.41 43.77,20.87 v2(44,21.1)
  16_Bottom w0.1: J9.4@41.995,14.705 42,14.71 R252.1@42,16.25
AMDI1_P: J9.3 R251.1 U17.A18 | length 11.8
  1_Top w0.1: U17.A18@42.9,23 42.95,22.95 42.95,22.644 43.5,22.094 43.5,21.2 43.4,21.2 v2(43.3,21.1)
  5_int4_(sign) w0.09: J9.3@43.3,17.28 J9.3@43.265,17.245 43.265,16.965 42.8,16.5 42.8,16.3 43,16.1 43.9,16.1 44.4,16.6 44.4,18.441 43.53,19.311 43.53,20.87 v2(43.3,21.1)
  16_Bottom w0.1: J9.3@43.265,17.245 43.55,17.53 R251.1@43.55,18.6
AMDI2_N: J9.6 R254.1 U17.A22 | length 18.1
  1_Top w0.1: U17.A22@45.3,23 45.3,21.934 45.11,21.744 45.11,20.917 v2(45.327,20.7)
  12_int11_(sign) w0.09: J9.6@40.725,17.245 41.655,17.245 42.4,16.5 42.4,16.3 42.1,16 39.8,16 39.5,16.3 39.5,17.961 40.799,19.26 44.588,19.26 45.129,19.801 45.129,20.501 v2(45.327,20.7)
  16_Bottom w0.1: R254.1@40.7,15.95 40.7,17.22 J9.6@40.725,17.245
AMDI2_P: J9.5 R253.1 U17.A21 | length 19.5
  1_Top w0.1: v2(44.69,20.7) 44.89,20.9 44.89,21.544 44.5,21.934 44.5,22.521 44.7,22.721 U17.A21@44.7,23
  12_int11_(sign) w0.09: J9.5@44.535,14.705 43.11,16.13 42.57,16.13 42.199,15.76 39.701,15.76 39.26,16.201 39.26,18.06 40.7,19.5 44.489,19.5 44.889,19.9 44.889,20.502 v2(44.69,20.7)
  16_Bottom w0.1: R253.1@43.75,13.5 43.75,13.92 J9.5@44.535,14.705
AMDI3_N: J9.8 R256.1 U17.A23 | length 21.4
  1_Top w0.1: U17.A23@45.9,23 45.9,22.4 46.22,22.08 46.22,21.66 v2(46.4,21.48)
  10_int9_(sign) w0.09: J9.8@38.185,17.245 38.4,17.03 38.4,15.9 38,15.5 37,15.5 36.5,16 36.5,18.5 36.96,18.96 45.499,18.96 46.17,19.631 46.17,21.25 v2(46.4,21.48)
  16_Bottom w0.1: R256.1@38.15,15.9 38.15,17.21 J9.8@38.185,17.245
AMDI3_P: J9.7 R255.1 U17.B20 | length 22.9
  1_Top w0.1: U17.B20@45.6,23.6 45.6,22.389 46,21.989 46,21.8 v2(45.7,21.5)
  10_int9_(sign) w0.09: J9.7@39.455,14.705 39.455,15.045 38.77,15.73 38.57,15.73 38.099,15.26 36.901,15.26 36.26,15.901 36.26,18.599 36.861,19.2 45.4,19.2 45.93,19.73 45.93,21.27 v2(45.7,21.5)
  16_Bottom w0.1: R255.1@38.65,13.5 38.65,13.9 J9.7@39.455,14.705
BMDI0_N: J10.2 R274.1 U20.A17 | length 13
  1_Top w0.1: v2@65.7,20.8 v2(65.7,20.7) 65.42,20.98 65.42,21.584 65.77,21.933 65.77,22.98 U20.A17@65.75,23
  7_int6_(sign) w0.09: v2(65.7,20.7) 65.47,20.47 65.47,20 66.87,18.6 67.599,18.6 68.04,18.159 68.04,16.6 68.64,16 69.5,16 69.6,16.1 69.6,16.9 J10.2@69.255,17.245
  16_Bottom w0.1: R274.1@68.7,18.5 68.7,17.8 J10.2@69.255,17.245
BMDI0_P: J10.1 R273.1 U20.A16 | length 13.4
  1_Top w0.1: v2@65,20.8 v2(65,20.7) 65.2,20.9 65.2,21.564 64.85,21.914 64.85,22.286 65.15,22.586 U20.A16@65.15,23
  7_int6_(sign) w0.09: v2(65,20.7) 65.23,20.47 65.23,19.901 66.771,18.36 67.5,18.36 67.8,18.06 67.8,16.501 68.541,15.76 69.54,15.76 70.525,14.775 J10.1@70.525,14.705
  16_Bottom w0.1: R273.1@70.45,16.05 70.45,14.78 J10.1@70.525,14.705
BMDI1_N: J10.4 R276.1 U20.B16 | length 13
  1_Top w0.1: U20.B16@66.65,23.6 66.65,23.35 66.65,22.738 66.738,22.65 66.748,22.65 66.92,22.478 66.92,21.38 67.1,21.2 v2(67.2,21.2)
  5_int4_(sign) w0.09: J10.4@65.445,14.705 65.445,14.905 66.3,15.76 67.299,15.76 68.14,16.601 68.14,18.16 66.97,19.33 66.97,20.97 v2(67.2,21.2)
  16_Bottom w0.1: J10.4@65.445,14.705 65.45,14.71 R276.1@65.45,16.25
BMDI1_P: J10.3 R275.1 U20.A18 | length 11.8
  1_Top w0.1: U20.A18@66.35,23 66.43,22.92 66.43,22.647 66.647,22.43 66.656,22.43 66.7,22.386 66.7,21.3 66.6,21.2 v2(66.5,21.2)
  5_int4_(sign) w0.09: v2(66.5,21.2) 66.73,20.97 66.73,19.231 67.9,18.061 67.9,16.7 67.2,16 66.5,16 66.4,16.1 66.4,16.7 66.715,17.015 J10.3@66.715,17.245
  16_Bottom w0.1: J10.3@66.715,17.245 67,17.53 R275.1@67,18.6
BMDI2_N: J10.6 R278.1 U20.A22 | length 18.1
  1_Top w0.1: v2(68.7,20.7) 68.56,20.84 68.56,21.944 68.85,22.234 68.85,22.566 68.75,22.666 U20.A22@68.75,23
  12_int11_(sign) w0.09: J10.6@64.175,17.245 64.955,17.245 65.9,16.3 65.9,16.1 65.8,16 63.5,16 63,16.5 63,18 64.16,19.16 67.929,19.16 68.47,19.701 68.47,20.47 v2(68.7,20.7)
  16_Bottom w0.1: R278.1@64.15,15.95 64.15,17.22 J10.6@64.175,17.245
BMDI2_P: J10.5 R277.1 U20.A21 | length 18.9
  1_Top w0.1: v2(68,20.7) 68.34,21.04 68.34,21.944 68.05,22.234 68.05,22.566 68.15,22.666 U20.A21@68.15,23
  12_int11_(sign) w0.09: J10.5@67.985,14.705 66.96,15.73 63.43,15.73 62.76,16.401 62.76,18.099 64.061,19.4 67.83,19.4 68.23,19.8 68.23,20.47 v2(68,20.7)
  16_Bottom w0.1: R277.1@67.2,13.5 67.985,14.285 J10.5@67.985,14.705
BMDI3_N: J10.8 R280.1 U20.A23 | length 22.6
  1_Top w0.1: J10.8@61.635,17.245 J10.8@62,16.88 ; U20.A23@69.35,23 69.35,22.55 69.52,22.38 69.52,21.68 v2@69.8,21.4
  10_int9_(sign) w0.09: J10.8@61.635,17.245 61.635,15.874 61.06,15.299 61.06,13.501 61.601,12.96 63.299,12.96 64.3,13.961 64.3,15.2 65.345,16.245 65.345,18.205 65.7,18.56 67.979,18.56 69.62,20.201 69.62,21.191 69.8,21.371 v2@69.8,21.4
  16_Bottom w0.1: R280.1@61.6,15.9 61.6,17.21 J10.8@61.635,17.245
  other v2: 69.9,21.4
BMDI3_P: J10.7 R279.1 U20.B20 | length 22.5
  1_Top w0.1: J10.7@62.905,14.705 J10.7@62.905,15.295 ; U20.B20@69.05,23.6 69.05,23.262 69.05,22.719 69.1,22.669 69.1,22.489 69.3,22.289 69.3,21.5 v2(69.2,21.4)
  10_int9_(sign) w0.09: J10.7@62.905,14.705 61.91,15.7 61.8,15.7 61.3,15.2 61.3,13.6 61.7,13.2 63.2,13.2 64.06,14.06 64.06,15.299 65.105,16.344 65.105,18.304 65.601,18.8 67.88,18.8 69.38,20.3 69.38,21.22 v2(69.2,21.4)
  16_Bottom w0.1: R279.1@62.1,13.5 62.905,14.305 J10.7@62.905,14.705
CLK_DIFF1_N: R336.1 U29.7 | length 2
  1_Top w0.15: U29.7@100.3,136.055 100.3,136.43 100.415,136.545 100.415,136.979 100.8,137.364 100.8,137.45 R336.1@100.55,137.7
CLK_DIFF1_P: R335.1 U29.6 | length 2
  1_Top w0.15: U29.6@100.8,136.055 100.8,136.43 100.685,136.545 100.685,136.867 101.15,137.332 101.15,137.45 R335.1@101.4,137.7
CLK_DIFF2_N: R338.1 U29.9 | length 2
  1_Top w0.15: R338.1@98.6,137.7 98.85,137.45 98.85,137.332 99.415,136.767 99.415,136.545 99.3,136.43 U29.9@99.3,136.055
CLK_DIFF2_P: R337.1 U29.8 | length 2
  1_Top w0.15: R337.1@99.45,137.7 99.2,137.45 99.2,137.364 99.685,136.879 99.685,136.545 99.8,136.43 U29.8@99.8,136.055
CLK_ENET_FPGA_N: C516.2 U1.AG28 | length 81.2
  1_Top w0.1: v2@58.3,126.99 58.39,126.9 C516.2@58.6,126.9 ; U1.AG28@90.194,69.939 90.261,69.939 v1(90.7,69.5)
  10_int9_(sign) w0.09: v2(58.1,126.9) 58.4,127.2 58.66,127.2 59.36,126.5 59.36,124.511 60.561,123.31 64.006,123.31 68.516,118.8 74.26,118.8 80.65,112.41 80.65,94.25 83.109,91.791 83.109,89.375 83.093,89.375 83.09,89.372 83.09,86.573 83.095,86.568 83.095,78.155 83.48,77.77 87.868,77.77 88.085,77.553 88.085,77.238 88.498,76.825 88.965,76.825 90.05,75.74 90.05,70.93 91.03,69.95 91.03,69.83 v1(90.7,69.5)
CLK_ENET_FPGA_P: C517.2 U1.AG29 | length 81.7
  1_Top w0.1: v2(58.1,127.669) 58.239,127.669 58.269,127.7 C517.2@58.6,127.7 ; U1.AG29@91.194,69.939 91.194,69.906 91.604,69.496 v1(91.604,69.478)
  10_int9_(sign) w0.09: v2(58.1,127.669) 58.329,127.44 58.759,127.44 59.6,126.599 59.6,124.61 60.66,123.55 64.105,123.55 68.615,119.04 74.359,119.04 80.89,112.509 80.89,94.349 83.349,91.89 83.349,89.276 83.33,89.257 83.33,88.282 83.335,88.277 83.335,78.254 83.579,78.01 87.967,78.01 88.325,77.652 88.325,77.337 88.597,77.065 89.064,77.065 90.29,75.839 90.29,71.029 91.27,70.049 91.27,69.83 91.604,69.496 v1(91.604,69.478)
CLOCK_I2C_SCL: U27.12 U28.12 U30.12 | length 29.8
  1_Top w0.17: v3(59.8,139.9) 60.245,139.455 U30.12@60.245,139.1
  1_Top w0.25: v2(51.5,124.95) 51.5,125.05 51.6,125.05 51.675,125.125 51.95,125.4 U28.12@52.3,125.4 ; U27.12@64.4,128.65 64.4,129.15 v2(64.45,129.2)
  7_int6_(sign) w0.15: v2(51.5,124.95) 51.8,124.95 52.4,125.55 52.4,127.13 54.51,129.24 57.94,129.24 59.4,130.7 62.4,130.7 ; v3(59.8,139.9) 59.9,139.8 59.9,136.26 62.4,133.76 62.4,130.7 ; v2(64.45,129.2) 62.95,130.7 62.4,130.7
CLOCK_I2C_SDA: U27.19 U28.19 U30.19 | length 14.5
  1_Top w0.17: 56.7,125.4 57,125.1 v3(57.1,125.1) ; v3(59.8,134.5) 60.245,134.945 U30.19@60.245,135.2
  1_Top w0.25: U28.19@56.2,125.4 56.7,125.4 ; v2(60.45,129.2) 60.5,129.15 U27.19@60.5,128.65
  5_int4_(sign) w0.15: v3(59.8,134.5) 60,134.3 60,130.7 60.45,130.25 v2(60.45,129.2)
  7_int6_(sign) w0.15: v3(57.1,125.1) 57.7,125.1 58.9,126.3 58.9,128.7 59.4,129.2 v2(60.45,129.2)
COMP01: C94.2 U10.E8 U10.H8 | length 5.7
  1_Top w0.25: U10.H8@148.345,77.29 148.345,77.3 148.96,77.915 v3(148.99,77.915) ; U10.E8@148.345,81.1 148.93,80.515 v3(148.96,80.515)
  16_Bottom w0.25: v3(148.96,80.515) 148.98,80.495 v3@148.99,80.495 ; v3(148.99,77.915) 148.99,77.82 v3@149.165,77.995
  16_Bottom w0.254: v3@148.99,80.495 149.09,80.595 149.99,79.695 149.99,78.695 149.29,77.995 v3@149.165,77.995
COMP02: C106.2 C107.2 U23.E8 U23.H8 | length 5.8
  1_Top w0.25: U23.E8@139.495,146.205 140.08,146.79 v3(140.08,146.82) ; v3(142.68,146.85) 142.68,146.82 143.295,146.205 U23.H8@143.305,146.205
  16_Bottom w0.25: v3(140.08,146.82) 140.1,146.84 v3@140.1,147.025 ; v3@142.6,147.025 142.775,146.85 v3(142.68,146.85)
  16_Bottom w0.254: v3@140.1,147.025 140.1,147.225 C107.2@140.7,147.825 142.08,147.825 C106.2@142.1,147.845 142.1,147.525 v3@142.6,147.025
DDR4_A0: R211.2 U1.G26 U14.P3 U15.P3 | length 93.6
  1_Top w0.25: U1.G26@88.194,89.939 v1@88.633,89.5 ; v1(88.6,89.5) v1@88.633,89.5 ; U15.P3@122.4,57 122.68,57.28 v1@122.68,57.48 ; U14.P3@122.4,69.7 122.4,69.878 v1(122.722,70.2)
  10_int9_(sign) w0.15: v1(88.6,89.5) 88.7,89.5 89.125,89.925 122.175,89.925 124.59,87.51 124.59,87 124.59,86.8 124.59,86.4 124.509,86.319 124.509,86.081 124.59,86 124.59,85.7 124.49,85.6 123.854,85.6 123.754,85.5 123.754,85.3 123.854,85.2 124.49,85.2 124.59,85.1 124.59,84.9 124.49,84.8 123.854,84.8 123.754,84.7 123.754,84.5 123.854,84.4 124.49,84.4 124.59,84.3 124.59,84.1 124.49,84 123.854,84 123.754,83.9 123.754,83.7 123.854,83.6 124.49,83.6 124.59,83.5 124.59,83.3 124.49,83.2 123.854,83.2 123.754,83.1 123.754,82.9 123.854,82.8 124.49,82.8 124.59,82.7 124.59,82.5 124.49,82.4 123.854,82.4 123.754,82.3 123.754,82.1 123.854,82 124.49,82 124.59,81.9 124.59,81.7 124.49,81.6 123.854,81.6 123.754,81.5 123.754,81.3 123.854,81.2 124.49,81.2 124.59,81.1 124.59,80.9 124.49,80.8 122.985,80.8 122.885,80.7 122.885,80.5 122.985,80.4 124.49,80.4 124.59,80.3 124.59,80.1 124.49,80 122.985,80 122.885,79.9 122.885,79.7 122.985,79.6 124.59,79.6 124.815,79.6 124.915,79.5 124.915,79.3 124.815,79.2 124.69,79.2 124.59,79.1 124.59,78.7 124.59,78.6 124.69,78.5 124.818,78.5 124.918,78.4 124.918,78.2 124.818,78.1 124.59,78.1 122.982,78.1 122.882,78 122.882,77.8 122.982,77.7 124.59,77.7 124.818,77.7 124.918,77.6 124.918,77.4 124.818,77.3 124.69,77.3 124.59,77.2 124.59,76.75 124.59,75.09 123.175,73.675 123.175,72.748 123.275,72.648 123.275,71.319 122.705,70.749 v1@122.705,70.295 ; v1(122.722,70.2) 122.705,70.217 v1@122.705,70.295 ; v1(122.756,57.503) 122.697,57.503 122.225,57.975 122.225,60.026 122.364,60.165 122.364,60.815 122.275,60.904 122.275,62.875 122.3,62.9 122.7,63.3 122.7,63.56 122.7,63.625 122.7,63.963 122.588,64.075 122.335,64.075 122.223,64.188 122.223,64.413 122.335,64.525 122.7,64.525 122.878,64.525 122.99,64.638 122.99,64.863 122.878,64.975 122.7,64.975 122.222,64.975 122.11,65.088 122.11,65.313 122.222,65.425 122.588,65.425 122.7,65.538 122.7,65.875 122.7,66.1 122.7,66.4 122.275,66.825 122.275,67.524 122.275,68.969 122.7,69.394 122.7,70.3 v1@122.705,70.295
  16_Bottom w0.25: v1(122.756,57.503) 122.775,57.522 R211.2@122.775,58.2
DDR4_A1: R212.2 U1.F23 U14.P7 U15.P7 | length 89.5
  1_Top w0.25: U1.F23@85.194,90.939 85.194,90.994 v1(85.7,91.5) ; U15.P7@122.4,60.2 122.4,60.023 v1(122.7,59.723) ; U14.P7@122.4,72.9 122.422,72.9 v1(122.85,72.472)
  7_int6_(sign) w0.15: v1(85.7,91.5) 86.175,91.975 87.225,91.975 87.4,91.8 88.855,91.8 88.88,91.775 91.4,91.775 92.15,91.025 100.575,91.025 100.758,91.208 110.6,91.208 110.7,91.208 110.8,91.308 110.8,91.733 110.9,91.833 111.1,91.833 111.2,91.733 111.2,91.308 111.3,91.208 111.5,91.208 111.6,91.308 111.6,91.733 111.7,91.833 111.9,91.833 112,91.733 112,91.308 112.1,91.208 112.3,91.208 112.4,91.308 112.4,91.733 112.5,91.833 112.7,91.833 112.8,91.733 112.8,91.308 112.9,91.208 113.1,91.208 113.2,91.308 113.2,91.733 113.3,91.833 113.5,91.833 113.6,91.733 113.6,91.308 113.7,91.208 114.825,91.208 120.292,91.208 120.362,91.137 122.2,89.3 122.2,89.1 122.2,88.8 122.1,88.7 121.91,88.7 121.81,88.6 121.81,88.4 121.91,88.3 122.1,88.3 122.2,88.2 122.2,87.9 122.2,87.5 122.2,87.3 122.2,87.1 122.2,86.8 122.1,86.7 121.91,86.7 121.81,86.6 121.81,86.4 121.91,86.3 122.1,86.3 122.2,86.2 122.2,86 122.1,85.9 121.91,85.9 121.81,85.8 121.81,85.6 121.91,85.5 122.1,85.5 122.2,85.4 122.2,85.2 122.1,85.1 121.91,85.1 121.81,85 121.81,84.8 121.91,84.7 122.1,84.7 122.2,84.6 122.2,84.4 122.1,84.3 121.91,84.3 121.81,84.2 121.81,84 121.91,83.9 122.1,83.9 122.2,83.8 122.2,83.6 122.1,83.5 121.91,83.5 121.81,83.4 121.81,83.2 121.91,83.1 122.1,83.1 122.2,83 122.2,82.8 122.1,82.7 121.91,82.7 121.81,82.6 121.81,82.4 121.91,82.3 122.1,82.3 122.2,82.2 122.2,82 122.1,81.9 121.91,81.9 121.81,81.8 121.81,81.6 121.91,81.5 122.1,81.5 122.2,81.4 122.2,81.2 122.1,81.1 121.91,81.1 121.81,81 121.81,80.8 121.91,80.7 122.1,80.7 122.2,80.6 122.2,80.4 122.1,80.3 121.91,80.3 121.81,80.2 121.81,80 121.91,79.9 122.1,79.9 122.2,79.8 122.2,79.6 122.1,79.5 121.91,79.5 121.81,79.4 121.81,79.2 121.91,79.1 122.1,79.1 122.2,79 122.2,78.8 122.1,78.7 121.91,78.7 121.81,78.6 121.81,78.4 121.91,78.3 122.2,78.3 122.289,78.3 122.389,78.2 122.389,78 122.289,77.9 122.2,77.9 121.91,77.9 121.81,77.8 121.81,77.6 121.91,77.5 122.2,77.5 122.615,77.5 122.715,77.4 122.715,77.2 122.615,77.1 122.2,77.1 121.91,77.1 121.81,77 121.81,76.8 121.91,76.7 122.2,76.7 122.615,76.7 122.715,76.6 122.715,76.4 122.615,76.3 122.2,76.3 121.91,76.3 121.81,76.2 121.81,76 121.91,75.9 122.1,75.9 122.2,75.8 122.2,74.949 122.425,74.724 122.425,73.604 122.2,73.379 122.2,73.122 v1(122.85,72.472) 122.78,72.403 122.78,70.981 122.275,70.476 122.275,70.261 122.275,68.275 121.865,67.865 121.865,66.135 122.275,65.725 122.275,65.2 122.275,64.975 122.275,64.525 122.275,64.188 122.387,64.075 122.453,64.075 122.565,63.963 122.565,63.738 122.453,63.625 122.275,63.625 121.969,63.625 121.856,63.513 121.856,63.288 121.969,63.175 122.275,63.175 122.453,63.175 122.565,63.063 122.565,62.838 122.453,62.725 122.275,62.725 121.948,62.725 121.836,62.613 121.836,62.388 121.948,62.275 122.163,62.275 122.275,62.163 122.275,62.1 122.275,61.025 122.375,60.925 122.375,60.048 122.225,59.898 122.225,59.415 122.305,59.335 122.62,59.335 122.755,59.47 122.755,59.668 v1(122.7,59.723)
  16_Bottom w0.25: v1(122.7,59.723) 122.775,59.648 R212.2@122.775,59
DDR4_A2: R213.2 U1.D25 U14.R3 U15.R3 | length 95.8
  1_Top w0.25: U1.D25@87.194,92.939 87.296,92.837 87.4,92.942 87.4,93.1 v1(87.7,93.4) ; U15.R3@123.2,57 123.2,56.978 123.556,56.622 v1(123.578,56.622) ; U14.R3@123.2,69.7 123.6,70.1 v1(123.6,70.2)
  7_int6_(sign) w0.15: v1(87.7,93.4) 88,93.4 88.45,92.95 89.1,92.95 89.225,93.075 92.225,93.075 92.3,93 119.779,93 119.796,93.018 121.007,93.018 122.604,91.42 123.38,91.42 124.2,90.6 124.2,89.036 124.2,88.836 124.2,88.436 124.2,88.136 124.3,88.036 124.99,88.036 125.09,87.936 125.09,87.736 124.99,87.636 124.3,87.636 124.2,87.536 124.2,87.336 124.3,87.236 124.99,87.236 125.09,87.136 125.09,86.936 124.99,86.836 124.2,86.836 123.948,86.836 123.848,86.736 123.848,86.536 123.948,86.436 124.2,86.436 124.99,86.436 125.09,86.336 125.09,86.136 124.99,86.036 124.2,86.036 123.835,86.036 123.735,85.936 123.735,85.736 123.835,85.636 124.2,85.636 124.99,85.636 125.09,85.536 125.09,85.336 124.99,85.236 124.2,85.236 123.835,85.236 123.735,85.136 123.735,84.936 123.835,84.836 124.2,84.836 124.99,84.836 125.09,84.736 125.09,84.536 124.99,84.436 124.2,84.436 123.835,84.436 123.735,84.336 123.735,84.136 123.835,84.036 124.2,84.036 124.99,84.036 125.09,83.936 125.09,83.736 124.99,83.636 124.2,83.636 123.835,83.636 123.735,83.536 123.735,83.336 123.835,83.236 124.2,83.236 124.99,83.236 125.09,83.136 125.09,82.936 124.99,82.836 124.3,82.836 124.2,82.736 124.2,82.6 124.2,79.65 124.2,79.55 124.3,79.45 124.93,79.45 125.03,79.35 125.03,79.15 124.93,79.05 124.3,79.05 124.2,78.95 124.2,78.75 124.3,78.65 124.93,78.65 125.03,78.55 125.03,78.35 124.93,78.25 124.3,78.25 124.2,78.15 124.2,77.875 124.2,76 125,75.2 125,71.8 123.6,70.4 v1(123.6,70.2)
  10_int9_(sign) w0.15: v1(123.578,56.622) 123.22,56.264 122.915,56.264 122.906,56.273 122.827,56.273 122.7,56.4 122.7,56.7 123.181,57.181 123.181,57.679 123.125,57.735 123.125,59.4 123.125,60.125 123.225,60.225 123.225,60.776 123.164,60.837 123.164,61.615 123.075,61.704 123.075,62.822 123.5,63.247 123.5,66.6 124.1,67.2 124.1,69.7 v1(123.6,70.2)
  16_Bottom w0.25: v1(123.578,56.622) 123.675,56.719 R213.2@123.675,57.3